# Altium PCB 9269_PCB1.PcbDoc (part 1 of 2)
Units mil, origin at the board's own origin, x right, y up, seen from the top; angles counter-clockwise.
Board outline 2770 x 5319.52 mil, 2 copper layers (Top Layer, Bottom Layer), stack 62.2 mil thick; 87 components, 63 nets, 294 pads, 108 vias.
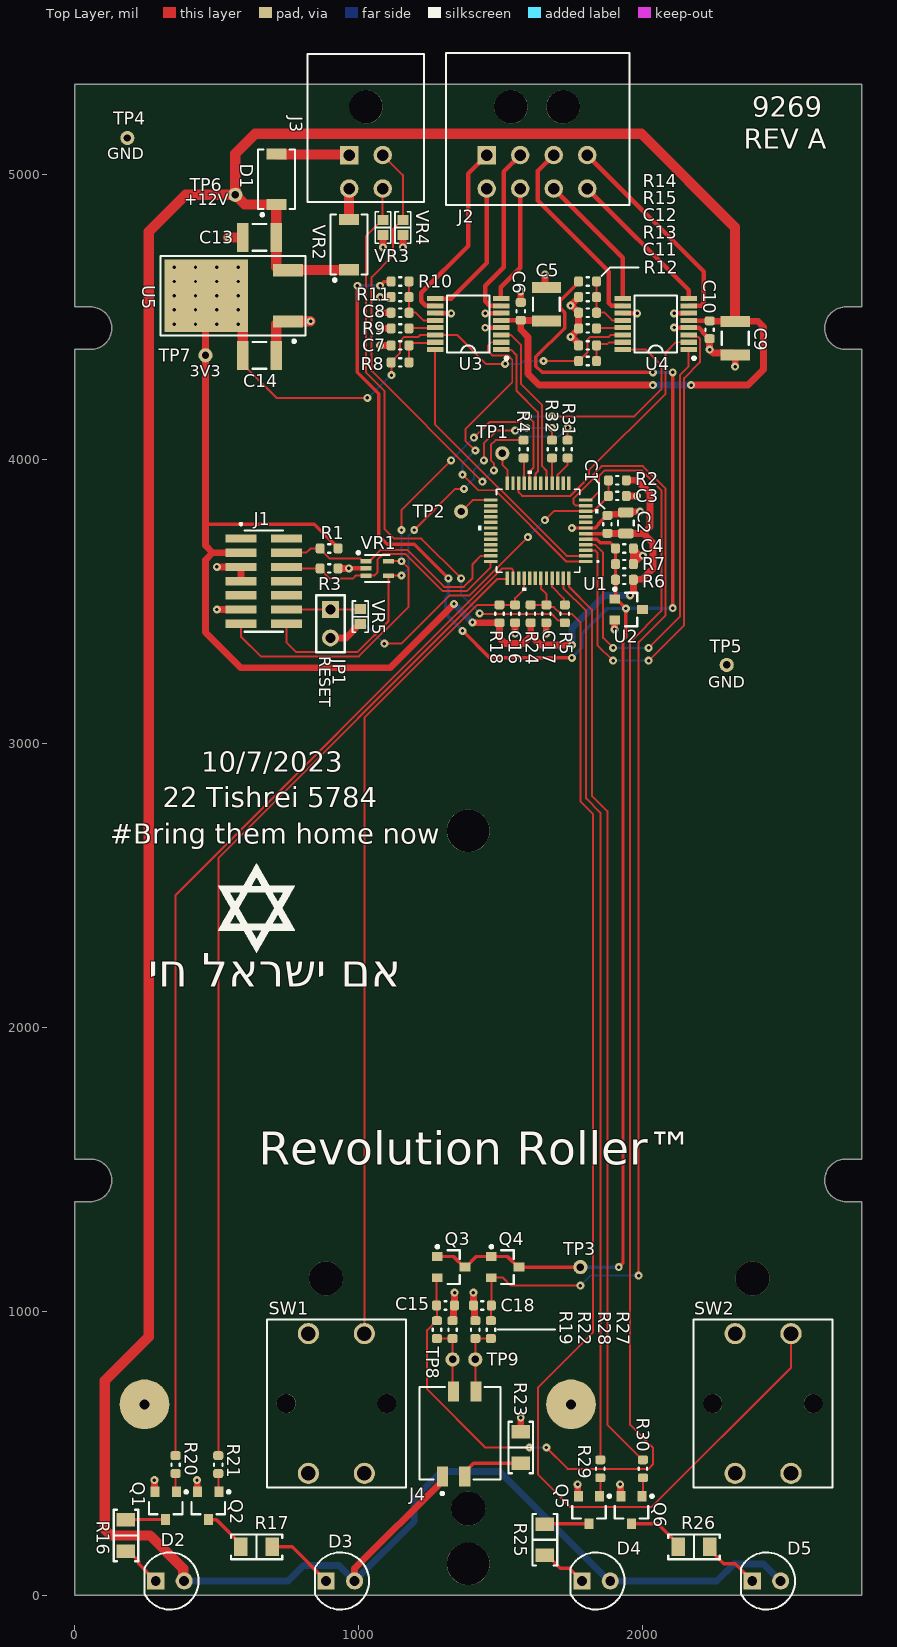
[diagram p0: Top Layer view]
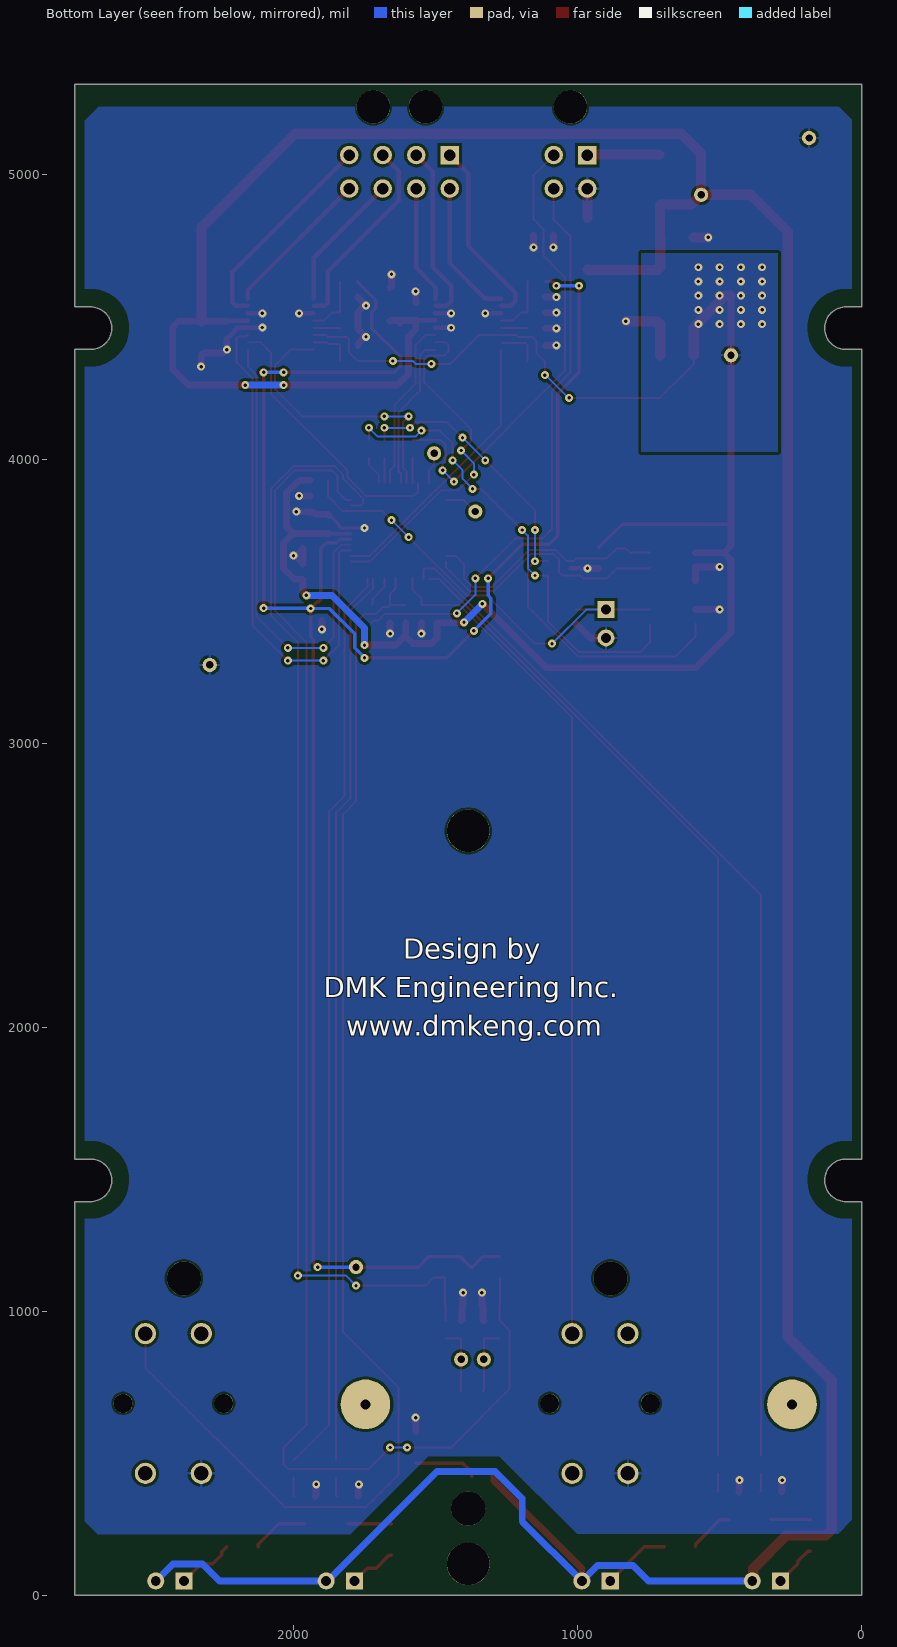
[diagram p1: Bottom Layer view, seen from below]
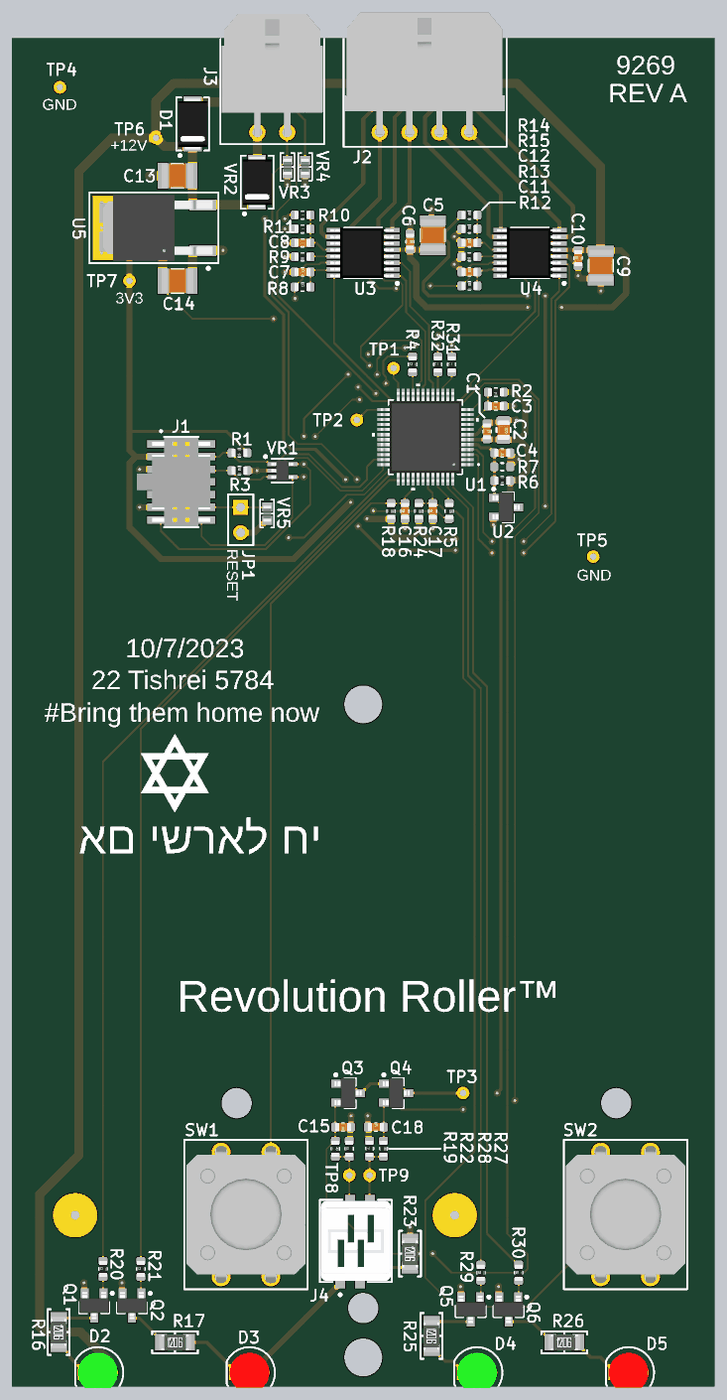
[diagram p2: 3D render of the assembled board from above, using the file's embedded part models]

## Layer stack, top to bottom
Top Solder: solder mask 0.4, Solder Resist, Dk 3.5
Top Layer: signal copper 1.4
Dielectric 1: dielectric 59.4, FR-4, Dk 4.8
Bottom Layer: signal copper 1.4
Bottom Solder: solder mask 0.4, Solder Resist, Dk 3.5

## Board outline
0,0 0,1385.54 55,1385.54 ccw(c55,1460.54) 55,1535.54 0,1535.54 0,4385.54 55,4385.54 ccw(c55,4460.54) 55,4535.54 0,4535.54 0,5319.52 2770,5319.52 2770,4535.54 2715,4535.54 ccw(c2715,4460.54) 2715,4385.54 2770,4385.54 2770,1535.54 2715,1535.54 ccw(c2715,1460.54) 2715,1385.54 2770,1385.54 2770,0

## Design rules (kind name [scope] priority, off if disabled: settings)
Clearance [All] p1: gap=7 ignorepadtopadclearanceinfootprint=FALSE except(10: Arc-Fill Arc-Poly Arc-Region Track-Fill Track-Poly Track-Region SMDPad-Fill SMDPad-Poly SMDPad-Region THPad-Fill THPad-Poly THPad-Region Via-Fill Via-Poly Via-Region Fill-Fill Fill-Poly Fill-Region Poly-Poly Poly-Region Region-Region)
HoleSize [All] p1: absolutevalues=TRUE maxlimit=150 minlimit=1 maxpercent=80.000 minpercent=20.000
MinimumSolderMaskSliver [All] p1: minsoldermaskwidth=0
PolygonConnect [All] p1: thpad.connectstyle=Relief thpad.reliefconductorwidth=10 thpad.reliefentries=4 thpad.polygonreliefangle="90 Angle" thpad.airgapwidth=10 smdpad.connectstyle=Relief smdpad.reliefconductorwidth=10 smdpad.reliefentries=4 smdpad.polygonreliefangle="90 Angle" smdpad.airgapwidth=10 via.connectstyle=Direct via.reliefconductorwidth=10 via.reliefentries=4 via.polygonreliefangle="90 Angle" via.airgapwidth=10
RoutingVias [All] p1: holewidth=12 width=28 viastyle="Through Hole" minholewidth=12 minwidth=24 maxholewidth=24 maxwidth=48
SilkToSilkClearance [All] p1: silktosilkclearance=6
SilkToSolderMaskClearance [IsPad] p1: minsilkscreentomaskgap=2 clearancetoexposedcopper=TRUE
SolderMaskExpansion [All] p1: expansion=4 istentingtop=FALSE
Width [All] p1: maxlimit=48 minlimit=7 preferedwidth=7
26 further rules are at their usual default settings.

## Classes and differential pairs
component class Sheet3: C13 C14 C15 C16 C17 C18 D1 D2 D3 D4 D5 J3 J4 Q1 Q2 Q3 Q4 Q5 Q6 R16 R17 R18 R19 R20 R21 R22 R23 R24 R25 R26 R27 R28 R29 R30 SW1 SW2 TP6 TP7 TP8 TP9 U5 VR3 VR4
component class Sheet2: C5 C6 C7 C8 C9 C10 C11 C12 J2 R8 R9 R10 R11 R12 R13 R14 R15 U3 U4 VR2
component class Sheet1: C1 C2 C3 C4 J1 JP1 R1 R2 R3 R4 R5 R6 R7 R31 R32 TP1 TP2 TP3 TP4 TP5 U1 U2 VR1 VR5

## Components (designator, comment, footprint, x,y, rotation, side; value= is the part's Value field where it differs from the comment)
C1 "100nF" C_0603 1875,3770 r270 top
C2 "10uF" C_0805 1940,3775 r90 top
C3 "100nF" C_0603 1910,3870 r180 top
C4 "100nF" C_0603 1935,3685 r180 top
C5 "47uF" C_1210 1660,4545 r270 top
C6 "100nF" C_0603 1570,4520 r270 top
C7 "22nF" C_0603 1145,4400 r0 top
C8 "100nF" C_0603 1145,4515 r0 top
C9 "47uF" C_1210 2325,4425 r90 top
C10 "100nF" C_0603 2235,4455 r90 top
C11 "22nF" C_0603 1805,4400 r0 top
C12 "100nF" C_0603 1805,4515 r0 top
C13 "47uF" C_1210 650,4780 r0 top
C14 "47uF" C_1210 650,4365 r180 top
C15 "100nF" C_0603 1305,1020 r180 top
C16 "100nF" C_0603 1550,3455 r90 top
C17 "100nF" C_0603 1660,3455 r90 top
C18 "100nF" C_0603 1435,1020 r0 top
D1 "DIODE SCHOTTKY" "DO-214AC (SMA)" 710,4985 r90 top
D2 "LED_GRN" LED_T1_GRN 335,50 r0 top locked
D3 "LED_RED" LED_T1_RED 935,50 r0 top locked
D4 "LED_GRN" LED_T1_GRN 1835,50 r0 top
D5 "LED_RED" LED_T1_RED 2435,50 r0 top
J1 "Header 7X2" SAMTEC_FTSH-107-01-L-DV-K-P-TR 665,3570 r270 top
J2 "Header 4X2A" "MOLEX 43045-0800" 1627,5070 r180 top
J3 "Header 2X2A" "MOLEX 43045-0400" 1025,5070 r180 top
J4 "Header 2x2" "Kyocera 009159004651906" 1353,568 r0 top
JP1 "Jumper" HDR1X2 900,3470 r270 top
Q1 "NMOS-2" SOT23-3 320,315 r270 top
Q2 "NMOS-2" SOT23-3 470,315 r270 top
Q3 "MMBT3906" SOT23-3 1325,1155 r0 top
Q4 "MMBT3906" SOT23-3 1515,1155 r0 top
Q5 "NMOS-2" SOT23-3 1810,300 r270 top
Q6 "NMOS-2" SOT23-3 1960,300 r270 top
R1 "1M0" R_0603 895,3685 r0 top value=1MR
R2 "1M0" R_0603 1910,3925 r0 top value=1MR
R3 "10K" R_0603 895,3615 r180 top value=10kR
R4 "43R0" R_0603 1580,4035 r270 top value=43R
R5 "43R0" R_0603 1725,3455 r90 top value=43R
R6 "1K0" R_0603 1935,3575 r0 top value=1kR
R7 "DNI" "R_0603 - DNI" 1935,3630 r0 top
R8 "10K" R_0603 1145,4340 r180 top value=10kR
R9 "49K9" R_0603 1145,4460 r0 top value=49.9kR
R10 "5K11" R_0603 1145,4625 r180 top value=5.11kR
R11 "10K" R_0603 1145,4570 r180 top value=10kR
R12 "10K" R_0603 1805,4345 r180 top value=10kR
R13 "49K9" R_0603 1805,4460 r0 top value=49.9kR
R14 "5K11" R_0603 1805,4625 r180 top value=5.11kR
R15 "10K" R_0603 1805,4570 r180 top value=10kR
R16 "562R" R_1206 180,210 r270 top
R17 "562R" R_1206 640,170 r0 top
R18 "3K3" R_0603 1495,3455 r90 top
R19 "10K" R_0603 1275,935 r90 top value=10kR
R20 "43R0" R_0603 355,460 r270 top value=43R
R21 "43R0" R_0603 505,460 r270 top value=43R
R22 "10K" R_0603 1330,935 r270 top value=10kR
R23 "909R" R_1206 1570,520 r270 top
R24 "3K3" R_0603 1605,3455 r90 top
R25 "562R" R_1206 1655,195 r270 top
R26 "562R" R_1206 2180,170 r0 top
R27 "10K" R_0603 1465,935 r90 top value=10kR
R28 "10K" R_0603 1410,935 r270 top value=10kR
R29 "43R0" R_0603 1850,445 r270 top value=43R
R30 "43R0" R_0603 2000,445 r270 top value=43R
R31 "43R0" R_0603 1735,4035 r270 top value=43R
R32 "43R0" R_0603 1680,4035 r270 top value=43R
SW1 "PTS125SL43P25M" "SWITCH PUSHBUTTON C&K PTS125" 921,675 r270 top locked
SW2 "PTS125SL43P25M" "SWITCH PUSHBUTTON C&K PTS125" 2423,675 r270 top locked
TP1 "TEST POINT" TP 1505,4020 r90 top
TP2 "TEST POINT" TP 1360,3815 r90 top
TP3 "TEST POINT" TP 1780,1155 r90 top
TP4 "TEST POINT" TP 185,5130 r90 top
TP5 "TEST POINT" TP 2295,3275 r90 top
TP6 "TEST POINT" TP 565,4930 r90 top
TP7 "TEST POINT" TP 460,4365 r90 top
TP8 "TEST POINT" TP 1330,830 r90 top
TP9 "TEST POINT" TP 1410,830 r90 top
U1 "STM32C031C6T6" LQFP48-7x7mm_STM 1631.1,3747.32 r180 top
U2 "LM4040" SOT23-3 1950,3470 r0 top
U3 "TC78H660FNG" TSSOP-16 1385,4475 r180 top
U4 "TC78H660FNG" TSSOP-16 2045,4475 r180 top
U5 "Voltage Regulator DPAK" "DPAK (TO-252) Large" 501.97,4574.45 r90 top
VR1 "ESD Quad Diode" "SOT-353-5 (SC70)" 1065,3615 r0 top value=7.5pF
VR2 "SMAJ12A" "DO-214AC (SMA)" 965,4755 r90 top
VR3 "TVS Diode Bidirectional" BEAD_0603 1085,4815 r270 top value=0.5pF
VR4 "TVS Diode Bidirectional" BEAD_0603 1155,4815 r270 top value=0.5pF
VR5 "TVS Diode Bidirectional" BEAD_0603 1005,3445 r270 top value=0.5pF

## Footprints (in the part's own frame and the unit in brackets; to place one, negate y for a bottom-side part, rotate by r counter-clockwise, add the part's x,y. Pads: shape width x height; smd on the part's side, far side on the other; paste and mask are expansions set on the pad)
BEAD_0603 [mm] "Chip Ferrite, 2-Leads, Body 1.60x0.80mm, IPC Medium Density"
  rect 0.9x1 smd: 1(-0.675,0) 2(0.675,0)
  silkscreen extent -1.4,-0.7 1.4,0.7, body extent -0.8,-0.41 0.8,0.41, height 0.82
C_0603 [mm] "Chip Capacitor, 2-Leads, Body 1.6x0.8mm, IPC Medium Density"
  rrect50% 0.8x0.9 smd: 1(-0.8,0) 2(0.8,0)
  silkscreen extent -0.1,-0.38 0.1,0.38, body extent -0.8,-0.4 0.8,0.4, height 0.3
C_0805 [mm] "0805 (2012 Metric) 0.079\" L x 0.049\" W (2.00mm x 1.25mm)"
  rrect50% 0.9x1.4 smd: 1(0.95,0) 2(-0.95,0)
  silkscreen extent -0.2,-0.7 0.2,0.7, body extent -1,-0.63 1,0.62, height 0.78
C_1210 [mm] "Chip Capacitor, 2-Leads, Body 3.2x2.5mm, IPC Medium Density"
  rect 1x2.6 smd: 1(-1.5,0) 2(1.5,0)
  silkscreen extent -0.6,-1.2 0.6,1.2, body extent -1.6,-1.25 1.6,1.25, height 0.95
"DO-214AC (SMA)" [mm]
  rect 1x1.8 smd: 1(-2.25,0) 2(2.25,0)
  silkscreen extent -3.3,-1.65 2.67,1.65, body extent -2.64,-1.46 2.64,1.46, height 2.41
"DPAK (TO-252) Large" [mm]
  rect 1.1x2.7 smd: 1(-2.3,-6.3) 2(2.3,-6.3)
  rect 2x2.5 on Top Paste: 3(-1.4,2.8) 3(-1.4,-0.5) 3(1.5,2.8) 3(1.5,-0.5)
  rect 6.5x7.5 smd paste-3.25: 3(0,1)
  silkscreen extent -4.19,-7.87 3.56,5.08, body extent -3.3,-7.29 3.3,3.71, height 2.31
HDR1X2 [mm] "Connector; Header; 2 Position"
  rect 1.5x1.5 hole 0.9: 1(0,0)
  round 1.5 hole 0.9: 2(2.54,0)
  silkscreen extent -1.27,-1.27 3.81,1.27
"Kyocera 009159004651906" [mm]
  rect 1x1.8 smd: 1(-1.5,-3.8) 2(0.5,-3.8) 3(1.5,3.8) 4(-0.5,3.8)
  silkscreen extent -3.56,-5.45 3.68,4.19, body extent -3.43,-3.94 3.57,4.06, height 5.01
LED_T1_GRN [mil]
  rect 60x60 hole 35: 1(-50,0)
  round 60 hole 35: 2(50,0)
  silkscreen extent -90,-101 101,101, body extent -78,-59 78,78, height 262
LED_T1_RED [mil]
  rect 60x60 hole 35: 1(-50,0)
  round 60 hole 35: 2(50,0)
  silkscreen extent -90,-101 101,101, body extent -78,-59 78,78, height 262
LQFP48-7x7mm_STM [mil]
  rect 47x12 smd paste+0 mask+0: 1(-167.32,108.27) 2(-167.32,88.58) 3(-167.32,68.9) 4(-167.32,49.21) 5(-167.32,29.53) 6(-167.32,9.84) 7(-167.32,-9.84) 8(-167.32,-29.53) 9(-167.32,-49.21) 10(-167.32,-68.9) 11(-167.32,-88.58) 12(-167.32,-108.27) 25(167.32,-108.27) 26(167.32,-88.58) 27(167.32,-68.9) 28(167.32,-49.21) 29(167.32,-29.53) 30(167.32,-9.84) 31(167.32,9.84) 32(167.32,29.53) 33(167.32,49.21) 34(167.32,68.9) 35(167.32,88.58) 36(167.32,108.27)
  rect 12x47 smd paste+0 mask+0: 13(-108.27,-167.32) 14(-88.58,-167.32) 15(-68.9,-167.32) 16(-49.21,-167.32) 17(-29.53,-167.32) 18(-9.84,-167.32) 19(9.84,-167.32) 20(29.53,-167.32) 21(49.21,-167.32) 22(68.9,-167.32) 23(88.58,-167.32) 24(108.27,-167.32) 37(108.27,167.32) 38(88.58,167.32) 39(68.9,167.32) 40(49.21,167.32) 41(29.53,167.32) 42(9.84,167.32) 43(-9.84,167.32) 44(-29.53,167.32) 45(-49.21,167.32) 46(-68.9,167.32) 47(-88.58,167.32) 48(-108.27,167.32)
  silkscreen extent -214,-211 211,211, body extent -177,-177 177,177, height 63
"MOLEX 43045-0400" [mil]
  rect 65x65 hole 40: 1(59,0)
  round 65 hole 40: 2(-59,0) 3(59,118) 4(-59,118)
  round 118 hole 118 unplated: 9(0,-170)
  silkscreen extent -205,-355 205,165, body extent -200,-350 200,132, height 346
"MOLEX 43045-0800" [mil]
  rect 65x65 hole 40: 1(177,0)
  round 65 hole 40: 2(59,0) 3(-59,0) 4(-177,0) 5(177,118) 6(59,118) 7(-59,118) 8(-177,118)
  round 118 hole 118 unplated: 9(-92,-170) 9(92,-170)
  silkscreen extent -325,-360 320,175, body extent -318,-355 318,127, height 346
R_0603 [mm] "Chip Resistor; Body 1.55 x 0.85 mm (LxW typ)"
  rrect50% 0.8x0.9 smd: 1(0.8,0) 2(-0.8,0)
  silkscreen extent -0.1,-0.38 0.1,0.38, body extent -0.8,-0.4 0.8,0.4, height 0.3
"R_0603 - DNI" [mm] "Chip Resistor; Body 1.55 x 0.85 mm (LxW typ)"
  rrect50% 0.8x0.9 smd: 1(0.8,0) 2(-0.8,0)
  silkscreen extent -0.1,-0.38 0.1,0.38
R_1206 [mm] "Chip Resistor, 2-Leads, Body 3.13x1.55mm, IPC Medium Density"
  rect 1.2x1.65 smd: 1(-1.4,0) 2(1.4,0)
  silkscreen extent -2.3,-1.1 2.3,1.1, body extent -1.57,-0.8 1.63,0.8, height 0.6
SAMTEC_FTSH-107-01-L-DV-K-P-TR [mm]
  rect 0.74x2.79 smd: 1(-3.81,-2.035) 2(-3.81,2.035) 3(-2.54,-2.035) 4(-2.54,2.035) 5(-1.27,-2.035) 6(-1.27,2.035) 7(0,-2.035) 8(0,2.035) 9(1.27,-2.035) 10(1.27,2.035) 11(2.54,-2.035) 12(2.54,2.035) 13(3.81,-2.035) 14(3.81,2.035)
  silkscreen extent -5.19,-2.13 4.53,1.72, body extent -4.45,-4.44 4.44,2.92, height 7
SOT23-3 [mm] "SOT23, 3-Leads, Body 2.92x2.51mm, Pitch 0.95mm, IPC Medium Density"
  rect 0.95x0.8 smd: 1(-1.235,0.95) 2(-1.235,-0.95) 3(1.235,0)
  silkscreen extent -1.36,-1.5 0.76,1.95, body extent -1.36,-1.52 1.36,1.52, height 1.12
"SOT-353-5 (SC70)" [mm] "SOT23, 6-Leads, Body 2.92x2.51mm, Pitch 0.95mm, IPC Medium Density"
  rect 1x0.4 smd: 1(-1,0.65) 2(-1,0) 3(-1,-0.65) 4(1,-0.65) 5(1,0.65)
  silkscreen extent -1.82,-1.2 1.1,1.52, body extent -1.1,-1 1.1,1, height 0.97
"SWITCH PUSHBUTTON C&K PTS125" [mm]
  round 1.9 hole 1.3: 1(-6.25,2.5) 2(6.25,2.5) 3(6.25,-2.5) 4(-6.25,-2.5)
  round 1.7 hole 1.7 unplated: 5(0,4.5) 6(0,-4.5)
  silkscreen extent -7.5,-6.2 7.5,6.2, body extent -6.85,-6 6.85,6, height 4.31
TP [mil] "Test Point"
  round 50 hole 26: 1(0,0)
TSSOP-16 [mm]
  rect 1.45x0.45 smd: 1(-2.95,2.275) 2(-2.95,1.625) 3(-2.95,0.975) 4(-2.95,0.325) 5(-2.95,-0.325) 6(-2.95,-0.975) 7(-2.95,-1.625) 8(-2.95,-2.275) 9(2.95,-2.275) 10(2.95,-1.625) 11(2.95,-0.975) 12(2.95,-0.325) 13(2.95,0.325) 14(2.95,0.975) 15(2.95,1.625) 16(2.95,2.275)
  silkscreen extent -3.56,-2.54 1.91,3.17, body extent -3.08,-2.5 3.32,2.5, height 1.22

## Part data
C1 C3 C4 C6 C8 C10 C12 C15 C16 C17 C18: library part CAP, "CAP CER 0.1UF 50V X7R 0603", Case Code (Imperial)=0603, Case Code (Metric)=1608, Manufacturer=Samsung, Manufacturer Part Number=CL10B104KB8NNWC, Max Operating Temperature=125°C, Min Operating Temperature=-55°C, Package Quantity=1, Supplier Part Number 1=187-CL10B104KB8NNWC, Tolerance=10%, Voltage Rating=50V, Capacitance=100nF, Case/Package=0603, Category="Ceramic Capacitors", ComponentLink1Description=https://datasheet.ciiva.com/25740/cl10b104kb8nnwc-25740227.pdf?src-supplier=Digikey, ComponentLink1URL=https://datasheet.ciiva.com/25740/cl10b104kb8nnwc-25740227.pdf?src-supplier=Digikey, Length=0.063inch, Mounting Technology="Surface Mount", Packaging="Cut Tape", Pricing 1="1=0.1, 10=0.009, 50=0.009, 100=0.006, 1000=0.005, 10000=0.003 (USD)", RoHS=Yes, RoHS Compliant=Yes, Series=CL, Stock 1=581862, Supplier 1=Mouser, Thickness=0.035inch, Width=0.031inch
C2: library part CAP, "Multilayer Ceramic Capacitor, 10 uF, 25 V, ± 10%, X5R, 0805 [2012 Metric]", Case Code (Imperial)=0805, Case Code (Metric)=2012, Dielectric=X5R, Manufacturer=Samsung, Manufacturer Part Number=CL21A106KAYNNNE, Max Operating Temperature=85°C, Min Operating Temperature=-55°C, Package Quantity=1, Supplier Part Number 1=187-CL21A106KAYNNNE, Tolerance=10%, Voltage Rating=25V, Case/Package=0805, Category="Ceramic Capacitors", ComponentLink1Description=https://datasheet.ciiva.com/25796/cl21a106kaynnne-25796720.pdf?src-supplier=Digikey, ComponentLink1URL=https://datasheet.ciiva.com/25796/cl21a106kaynnne-25796720.pdf?src-supplier=Digikey, ComponentLink2Description=https://datasheet.ciiva.com/26838/getdatasheetpartid-357558-26838583.pdf?src-supplier=Verical, ComponentLink2URL=https://datasheet.ciiva.com/26838/getdatasheetpartid-357558-26838583.pdf?src-supplier=Verical, Construction=Flat, Depth=1.25mm, Height=1.25mm, Length=2mm, Material=Ceramic, Mounting Technology="Surface Mount", Packaging="Tape and Reel", Pricing 1="1=0.18, 10=0.073, 50=0.073, 100=0.043, 1000=0.035, 2000=0.029, 10000=0.026, 24000=0.024, 50000=0.022, 100000=0.018 (USD)", Radiation Hardening=No, RoHS=Yes, RoHS Compliant=Yes, Series=CL, Stock 1=463149, Supplier 1=Mouser, Thickness=0.057inch, Voltage Rating (DC)=25V, Width=0.049inch
C5 C9 C13 C14: library part CAP, "Multilayer Ceramic Capacitor, 47 uF, 16 V, ± 10%, X5R, 1210 [3225 Metric]", Case Code (Imperial)=1210, Case Code (Metric)=3225, Dielectric=X5R, Manufacturer=Samsung, Manufacturer Part Number=CL32A476KOJNNNE, Max Operating Temperature=85°C, Min Operating Temperature=-55°C, Package Quantity=1, Supplier Part Number 1=187-CL32A476KOJNNNE, Tolerance=10%, Voltage Rating=16V, Capacitance=47uF, Case/Package=1210, Category="Ceramic Capacitors", ComponentLink1Description=https://datasheet.ciiva.com/25785/cl32a476kojnnne-25785873.pdf?src-supplier=Digikey, ComponentLink1URL=https://datasheet.ciiva.com/25785/cl32a476kojnnne-25785873.pdf?src-supplier=Digikey, Height=2.8mm, Lead Free="Lead Free", Length=0.126inch, Material=4241ConductorMaterial, Mounting Technology="Surface Mount", Packaging="Cut Tape", Pricing 1="1=0.65, 10=0.386, 50=0.386, 100=0.249, 1000=0.204, 2000=0.185, 10000=0.168, 25000=0.164, 50000=0.161 (USD)", RoHS=Yes, RoHS Compliant=Yes, Series=CL, Stock 1=246355, Supplier 1=Mouser, Thickness=0.106inch, Voltage Rating (DC)=16V, Width=0.098inch
C7 C11: library part CAP, "Multilayer Ceramic Capacitor, 0.022 uF, 50 V, ± 10%, X7R, 0603 [1608 Metric]", Case Code (Imperial)=0603, Case Code (Metric)=1608, Dielectric=X7R, Manufacturer=Samsung, Manufacturer Part Number=CL10B223KB8NNNC, Max Operating Temperature=125°C, Min Operating Temperature=-55°C, Package Quantity=1, Supplier Part Number 1=187-CL10B223KB8NNNC, Tolerance=10%, Voltage=50V, Capacitance=22nF, Case/Package=0603, Category="Ceramic Capacitors", ComponentLink1Description=https://datasheet.ciiva.com/25802/cl10b223kb8nnnc-25802289.pdf?src-supplier=Digikey, ComponentLink1URL=https://datasheet.ciiva.com/25802/cl10b223kb8nnnc-25802289.pdf?src-supplier=Digikey, ComponentLink2Description=https://datasheet.ciiva.com/26838/getdatasheetpartid-357419-26838449.pdf?src-supplier=Verical, ComponentLink2URL=https://datasheet.ciiva.com/26838/getdatasheetpartid-357419-26838449.pdf?src-supplier=Verical, ComponentLink3Description=https://datasheet.ciiva.com/29198/457190-da-01-en-vs-kondensator-0603-29198760.pdf?src-supplier=Conrad, ComponentLink3URL=https://datasheet.ciiva.com/29198/457190-da-01-en-vs-kondensator-0603-29198760.pdf?src-supplier=Conrad, ComponentLink4Description=https://datasheet.ciiva.com/26310/mlcc-catalogdownload2013-eng-26310316.pdf?src-supplier=Distrelec, ComponentLink4URL=https://datasheet.ciiva.com/26310/mlcc-catalogdownload2013-eng-26310316.pdf?src-supplier=Distrelec, ComponentLink5Description=https://datasheet.ciiva.com/16318/cl05b104kq5nnnc-16318246.pdf?src-supplier=Future+Electronics, ComponentLink5URL=https://datasheet.ciiva.com/16318/cl05b104kq5nnnc-16318246.pdf?src-supplier=Future+Electronics, Construction=Flat, Depth=0.8mm, Height=0.8mm, Lead Free="Lead Free", Length=1.6mm, Material=Ceramic, Mounting Technology="Surface Mount", Packaging="Tape and Reel", Pricing 1="1=0.1, 10=0.015, 50=0.015, 100=0.011, 1000=0.009, 10000=0.006 (USD)", Radiation Hardening=No, RoHS=Yes, RoHS Compliant=Yes, Series=CL, Stock 1=72426, Supplier 1=Mouser, Thickness=0.035inch, Voltage Rating=50V, Voltage Rating (DC)=50V, Width=0.031inch
D1: library part DIODE_SMA_SCHOTTKY, "Rectifier Diode, Schottky, 1 Phase, 1 Element, 2A, 100V V(RRM), Silicon, DO-214AC", Average Rectified Current=2A, Case/Package=SMA, Forward Voltage=880mV, Manufacturer=STMicroelectronics, Manufacturer Part Number=STPS2H100A, Max Forward Surge Current (Ifsm)=75A, Max Operating Temperature=175°C, Max Repetitive Reverse Voltage (Vrrm)=100V, Max Reverse Current=1uA, Min Operating Temperature=-65°C, Package Quantity=1, Supplier Part Number 1=511-STPS2H100A, Category="Rectifier Diodes", ComponentLink1Description=https://datasheet.ciiva.com/14178/cd00001548-14178421.pdf?src-supplier=Distrelec, ComponentLink1URL=https://datasheet.ciiva.com/14178/cd00001548-14178421.pdf?src-supplier=Distrelec, ComponentLink2Description=https://datasheet.ciiva.com/16394/cd00001548-16394856.pdf?src-supplier=Future+Electronics, ComponentLink2URL=https://datasheet.ciiva.com/16394/cd00001548-16394856.pdf?src-supplier=Future+Electronics, ComponentLink3Description=https://datasheet.ciiva.com/7963/1724011-7963926.pdf?src-supplier=Element14, ComponentLink3URL=https://datasheet.ciiva.com/7963/1724011-7963926.pdf?src-supplier=Element14, ComponentLink4Description=https://datasheet.ciiva.com/7963/1724011-7963927.pdf?src-supplier=Element14, ComponentLink4URL=https://datasheet.ciiva.com/7963/1724011-7963927.pdf?src-supplier=Element14, ComponentLink5Description=https://datasheet.ciiva.com/916/cd00001548-916178.pdf?src-supplier=Digikey, ComponentLink5URL=https://datasheet.ciiva.com/916/cd00001548-916178.pdf?src-supplier=Digikey, ComponentLink6Description=https://datasheet.ciiva.com/916/cd00001548-916177.pdf?src-supplier=Digikey, ComponentLink6URL=https://datasheet.ciiva.com/916/cd00001548-916177.pdf?src-supplier=Digikey, ComponentLink7Description=https://datasheet.ciiva.com/916/cd00001548-916179.pdf?src-supplier=Digikey, ComponentLink7URL=https://datasheet.ciiva.com/916/cd00001548-916179.pdf?src-supplier=Digikey, Current Rating=2A, Forward Current=2A, Height=2.03mm, Lead Free="Lead Free", Length=4.6mm, Max Reverse Leakage Current=1uA, Max Reverse Voltage (DC)=100V, Max Surge Current=75A, Mounting Technology="Surface Mount", Output Current=2A, Packaging="Tape and Reel", Peak Non-Repetitive Surge Current=75A, Pins=2, Polarity=Standard, Pricing 1="1=0.38, 10=0.294, 50=0.294, 100=0.177, 1000=0.115, 10000=0.088 (USD)", Radiation Hardening=No, Reach SVHC Compliant=No, RoHS=Yes, RoHS Compliant=Yes, Series=-, Stock 1=49306, Supplier 1=Mouser, Voltage Rating (DC)=100V, Width=2.95mm
D2 D4: "LED Uni-Color Green 515nm 2-Pin T-1 Bulk", Case/Package=Radial, Color=Green, Forward Current=20mA, Forward Voltage=3.3V, Lens Color=Colorless, Manufacturer=Kingbright, Manufacturer Part Number=WP710A10ZGCK, Max Operating Temperature=85°C, Min Operating Temperature=-40°C, Package Quantity=500, Supplier Part Number 1=604-WP710A10ZGCK, Category=LEDs, ComponentLink1Description=https://datasheet.ciiva.com/16421/wp710a10zgck-262246-16421032.pdf?src-supplier=Mouser, ComponentLink1URL=https://datasheet.ciiva.com/16421/wp710a10zgck-262246-16421032.pdf?src-supplier=Mouser, ComponentLink2Description=https://datasheet.ciiva.com/29562/wp710a10zgck-29562178.pdf?src-supplier=Digikey, ComponentLink2URL=https://datasheet.ciiva.com/29562/wp710a10zgck-29562178.pdf?src-supplier=Digikey, Dominant Wavelength=525nm, Height=5.9mm, Illumination Color=Green, Lead Free="Lead Free", Lens Size=3mm, Lens Style=Dome,Round,Domed, Lens Transparency=Clear, Luminous Intensity=8000mcd, Mounting Technology="Through Hole", Packaging=Bulk, Pricing 1="1=0.51, 10=0.338, 50=0.338, 100=0.226, 1000=0.155, 10000=0.149 (USD)", RoHS=Yes, Series=-, Stock 1=2647, Supplier 1=Mouser, Test Current=20mA, Viewing Angle=34°
D3 D5: "LED Uni-Color Red 630nm 2-Pin T-1 Bulk", Manufacturer=Kingbright, Manufacturer Part Number=WP710A10SURTK, Supplier Part Number 1=604-WP710A10SURTK, Pricing 1="1=0.37, 10=0.299, 50=0.299, 100=0.134, 1000=0.099, 10000=0.069 (USD)", RoHS=No, Stock 1=50, Supplier 1=Mouser
J1: "Conn Unshrouded Header HDR 14 POS 1.27mm Solder ST Top Entry SMD T/R", Manufacturer=Samtec, Manufacturer Part Number=FTSH-107-01-L-DV-K-P-TR, Supplier Part Number 1=200-FTSH10701LDVKPTR, Category="Headers and Wire Housings", ComponentLink1Description=https://datasheet.ciiva.com/10025/ftsh-mt-10025356.pdf?src-supplier=Avnet, ComponentLink1URL=https://datasheet.ciiva.com/10025/ftsh-mt-10025356.pdf?src-supplier=Avnet, Contact Plating=Gold, Gender=Male, Lead Free="Lead Free", Number of Contacts=14, Number of Rows=2, Pitch=1.27mm, Pricing 1="1=4.94, 10=4.46, 50=4.46, 100=3.95, 250=3.5, 400=3.44, 1000=3.44, 2400=3.32, 4800=2.5, 10000=3.32 (USD)", RoHS=Yes, RoHS Compliant=Yes, Stock 1=3070, Supplier 1=Mouser, Termination=Solder
J2: "Connector Wire to Board Header 8 Position 3mm Solder Right Angle Thru-Hole Tray", Contact Resistance=10mR, Flammability Rating="UL94 V-0", Housing Color=Black, Manufacturer=Molex, Manufacturer Part Number=0430450800, Max Operating Temperature=105°C, Max Voltage Rating (AC)=250V, Min Operating Temperature=-40°C, Supplier Part Number 1=538-43045-0800, Contact Material=Brass, Contact Plating=Tin, Depth=12.2mm, Housing Material=Polymer, LatestRevisionDate=17-Jul-2002, LatestRevisionNote="Re-released for DXP Platform.", Length=16.15mm, Number of Rows=2, Orientation="Right Angle", Packaging=Tray, Pitch=3mm, Pricing 1="1=2.63, 10=2.01, 50=2.01, 100=1.83, 1000=1.83, 10000=1.83, 10080=1.04 (USD)", Publisher="Altium Limited", RoHS=Yes, RoHS Compliant=Yes, Stock 1=6399, Supplier 1=Mouser, Termination=Solder
J3: "MOLEX 43045-0400 Header, Dual Row, 90°, 4p, Tin Plating Snap-in Peg PCB Lock, GW Compatible", Case/Package=101Case, Color=Black, Contact Resistance=10mR, Current Rating=5A, Flammability Rating=5813Flammability, Manufacturer=Molex, Manufacturer Part Number=43045-0400, Max Operating Temperature=105°C, Max Voltage Rating (AC)=250V, Max Voltage Rating (DC)=250.25kV, Min Operating Temperature=-40°C, Supplier Part Number 1=538-43045-0400, Voltage Rating=600V, Approvals=UL,CSA,TUV, Category="Headers and Wire Housings", Contact Gender=Male, Contact Material=Brass,Tin, Contact Plating=Tin, Contact Type="Male Pin", Depth=12.2mm, Diameter=3mm, Fastening Type=Ramp, Gender=Male, Glow Wire Compliant=15Compliance, Halogen Free=5696HalogenFree, Housing Color=Black, Housing Material=Thermoplastic, LatestRevisionDate=17-Jul-2002, LatestRevisionNote="Re-released for DXP Platform.", Lead Free=5697LeadFree, Lead Pitch=3mm, Length=10.15mm, Material=Polyester, Mounting Technology="Through Hole", Number of Circuits=4, Number of Contacts=4, Number of Poles=4, Number of Positions=4, Number of Rows=2, Orientation="Right Angle", Packaging=Tray, Pitch=3mm, Plating=154ConductorMaterial, Pricing 1="1=1.53, 10=0.877, 50=0.877, 100=0.782, 558=0.739, 1000=0.739, 1116=0.693, 10000=0.693, 10044=0.593 (USD)", Publisher="Altium Limited", Radiation Hardening=No, Reach SVHC Compliant=Unknown, RoHS=Yes, RoHS Compliant=Yes, Row Spacing=0.118inch, Series="Micro-Fit 3.0™ 43045", Stock 1=18230, Supplier 1=Mouser, Termination=Solder, Voltage Rating (AC)=250V, Voltage Rating (DC)=250V, Width=9.9mm, Working Voltage=250V
J4: "2x2 Position Female White Vertical Dual Row Top Entry Card Edge Connector", Manufacturer="Kyocera AVX", Manufacturer Part Number=009159004651906, Supplier Part Number 1=581-009159004651906, Pricing 1="1=0.99, 10=0.841, 50=0.841, 100=0.755, 1000=0.618, 10000=0.486 (USD)", RoHS=No, Stock 1=3916, Supplier 1=Mouser
JP1: library part "Header 2", "Jumper, 2-Pin (DNI)", LatestRevisionDate=17-Jul-2002, LatestRevisionNote="Re-released for DXP Platform.", Publisher="Altium Limited"
Q1 Q2 Q5 Q6: "Transistor MOSFET Negative Channel 100 Volt 0.17A 3-Pin SOT-23", Case/Package=SOT-23, Continuous Drain Current (ID)=170mA, Drain to Source Breakdown Voltage=100V, Drain to Source Resistance=6R, Gate to Source Voltage (Vgs)=20V, Input Capacitance=73pF, Manufacturer="ON Semiconductor / Fairchild", Manufacturer Part Number=BSS123, Max Operating Temperature=150°C, Max Power Dissipation=360mW, Min Operating Temperature=-55°C, Package Quantity=1, Supplier Part Number 1=512-BSS123, Threshold Voltage=1.7V, Category=MOSFETs, ComponentLink1Description="Manufacturer Link", ComponentLink1URL=http://www.irf.com/, ComponentLink2Description=https://datasheet.ciiva.com/3304/bss123-3304416.pdf?src-supplier=Avnet, ComponentLink2URL=https://datasheet.ciiva.com/3304/bss123-3304416.pdf?src-supplier=Avnet, ComponentLink3Description=https://datasheet.ciiva.com/4441/bss123-90724-4441226.pdf?src-supplier=Mouser, ComponentLink3URL=https://datasheet.ciiva.com/4441/bss123-90724-4441226.pdf?src-supplier=Mouser, ComponentLink4Description=https://datasheet.ciiva.com/17170/bss123-17170795.pdf?src-supplier=Future+Electronics, ComponentLink4URL=https://datasheet.ciiva.com/17170/bss123-17170795.pdf?src-supplier=Future+Electronics, Current Rating=170mA, DatasheetVersion=PD-9.814, Drain to Source Voltage (Vdss)=100V, Drain-source On Resistance-Max=6R, Dual Supply Voltage=100V, Fall Time=9ns, Height=0.93mm, LatestRevisionDate=17-Jul-2002, LatestRevisionNote="Re-released for DXP Platform.", Lead Free="Lead Free", Length=2.92mm, Mounting Technology="Surface Mount", Nominal Vgs=1.7V, Note="Pin 2 is electrically connected to pin 4.", Number of Channels=1NUMBER, Number of Elements=1, PackageDescription="TO, Thru-Hole, Vertical, Heatsink Mounted; 3 In-Line Leads; Pitch 2.54 mm", PackageReference=TO-220AB, PackageVersion=Feb-1997, Packaging="Tape and Reel", Pins=3, Polarity=N-CHANNEL, Power Dissipation=360mW, Pricing 1="1=0.35, 10=0.261, 50=0.261, 100=0.148, 1000=0.075, 10000=0.052 (USD)", Published=8-Jun-2000, Publisher="Altium Limited", Radiation Hardening=No, Rds On Max=6R, Reach SVHC Compliant=No, Rise Time=9ns, RoHS=Yes, RoHS Compliant=Yes, Series=-, Stock 1=1883, Supplier 1=Mouser, Turn-Off Delay Time=17ns, Turn-On Delay Time=1.7ns, Voltage=100V, Voltage Rating (DC)=100V, Width=1.3mm
Q3 Q4: library part PNP_SOT23, "Transistor: 200mA 200mW PNP General-Purpose Amplifier, SOT-23, 7IN. Reel", Case/Package=SOT-23, Clock Frequency=250MHz, Collector Base Voltage (VCBO)=40V, Collector Emitter Saturation Voltage=-250mV, Collector-emitter Voltage-Max=400mV, Current Rating=-2A, Emitter Base Voltage (VEBO)=5V, Manufacturer=MCC, Manufacturer Part Number=MMBT3906-TP, Max Collector Current=200mA, Max Operating Temperature=150°C, Max Power Dissipation=300mW, Min Operating Temperature=-55°C, Package Quantity=3000, Supplier Part Number 1=833-MMBT3906-TP, Voltage Rating (DC)=-40V, Category=BJTs, Collector Emitter Breakdown Voltage=40V, Collector Emitter Voltage (VCEO)=40V, ComponentLink1Description=https://datasheet.ciiva.com/6362/mmbt3906sot-23-6362513.pdf?src-supplier=Digikey, ComponentLink1URL=https://datasheet.ciiva.com/6362/mmbt3906sot-23-6362513.pdf?src-supplier=Digikey, ComponentLink2Description=https://datasheet.ciiva.com/15200/getdatasheetpartid-321202-15200524.pdf?src-supplier=Verical, ComponentLink2URL=https://datasheet.ciiva.com/15200/getdatasheetpartid-321202-15200524.pdf?src-supplier=Verical, ComponentLink3Description=https://datasheet.octopart.com/MMBT3906-TP-MCC-datasheet-38265.pdf?src-supplier=Digikey, ComponentLink3URL=https://datasheet.octopart.com/MMBT3906-TP-MCC-datasheet-38265.pdf?src-supplier=Digikey, ComponentLink4Description=https://datasheet.octopart.com/MMBT3906-TP-MCC-datasheet-133517506.pdf?src-supplier=Future+Electronics, ComponentLink4URL=https://datasheet.octopart.com/MMBT3906-TP-MCC-datasheet-133517506.pdf?src-supplier=Future+Electronics, ComponentLink5Description=https://datasheet.octopart.com/MMBT3906-TP-Micro-Commercial-datasheet-13551255.pdf?src-supplier=Future+Electronics, ComponentLink5URL=https://datasheet.octopart.com/MMBT3906-TP-Micro-Commercial-datasheet-13551255.pdf?src-supplier=Future+Electronics, ComponentLink6Description=https://datasheet.octopart.com/MMBT3906-TP-Micro-Commercial-datasheet-12536892.pdf?src-supplier=Future+Electronics, ComponentLink6URL=https://datasheet.octopart.com/MMBT3906-TP-Micro-Commercial-datasheet-12536892.pdf?src-supplier=Future+Electronics, ComponentLink7Description=https://datasheet.octopart.com/MMBT3906-TP-MCC-datasheet-9940751.pdf?src-supplier=RS+(Formerly+Allied+Electronics), ComponentLink7URL=https://datasheet.octopart.com/MMBT3906-TP-MCC-datasheet-9940751.pdf?src-supplier=RS+(Formerly+Allied+Electronics), Frequency=250MHz, Gain Bandwidth Product=250MHz, Height=1.12mm, hFE Min=60, Lead Free="Lead Free", Length=3.04mm, Max Breakdown Voltage=40V, Mounting Technology="Surface Mount", Number of Elements=1, Packaging="Tape and Reel", Pins=3, Polarity=PNP, Power Dissipation=300mW, Pricing 1="1=0.1, 10=0.06, 50=0.06, 100=0.026, 1000=0.018, 3000=0.013, 9000=0.011, 10000=0.011 (USD)", Radiation Hardening=No, RoHS Compliant=Yes, Series=-, Stock 1=36273, Supplier 1=Mouser, Transition Frequency=250MHz, Width=1.4mm
R1 R2: library part CMP-2002-07535-1, "Res Thick Film 0603 1M Ohm 1% 1/10W ±100ppm/°C Molded SMD Punched Carrier T/R", Case Code (Imperial)=0603, Case Code (Metric)=1608, Manufacturer=Panasonic, Manufacturer Part Number=ERJ-3EKF1004V, Max Operating Temperature=155°C, Max Power Dissipation=100mW, Min Operating Temperature=-55°C, Package Quantity=1, Resistance Tolerance=1%, Resistor Type="Thick Film", Supplier Part Number 1=667-ERJ-3EKF1004V, Temperature Coefficient=100ppm/°C, Voltage Rating=75V, Case/Package=0603, Category="Chip SMD Resistors", ComponentLink1Description=http://www.farnell.com/datasheets/1911175.pdf?src-supplier=Farnell, ComponentLink1URL=http://www.farnell.com/datasheets/1911175.pdf?src-supplier=Farnell, ComponentLink2Description=http://www.farnell.com/datasheets/1678782.pdf?src-supplier=Farnell, ComponentLink2URL=http://www.farnell.com/datasheets/1678782.pdf?src-supplier=Farnell, ComponentLink3Description=http://components.arrow.com/part/dataview/3985224S9849817N1386?src-supplier=Arrow+Electronics, ComponentLink3URL=http://components.arrow.com/part/dataview/3985224S9849817N1386?src-supplier=Arrow+Electronics, ComponentLink4Description=http://www.farnell.com/datasheets/1911175.pdf?src-supplier=Element14, ComponentLink4URL=http://www.farnell.com/datasheets/1911175.pdf?src-supplier=Element14, ComponentLink5Description=http://www.farnell.com/datasheets/1678782.pdf?src-supplier=Element14, ComponentLink5URL=http://www.farnell.com/datasheets/1678782.pdf?src-supplier=Element14, ComponentLink6Description=https://datasheet.octopart.com/ERJ-3EKF1004V-Panasonic-datasheet-10025800.pdf?src-supplier=Element14, ComponentLink6URL=https://datasheet.octopart.com/ERJ-3EKF1004V-Panasonic-datasheet-10025800.pdf?src-supplier=Element14, ComponentLink7Description=https://datasheet.octopart.com/ERJ-3EKF1004V-Panasonic-datasheet-136608610.pdf?src-supplier=Farnell, ComponentLink7URL=https://datasheet.octopart.com/ERJ-3EKF1004V-Panasonic-datasheet-136608610.pdf?src-supplier=Farnell, ComponentLink8Description=https://datasheet.octopart.com/ERJ-3EKF1004V-Panasonic-datasheet-82288794.pdf?src-supplier=Future+Electronics, ComponentLink8URL=https://datasheet.octopart.com/ERJ-3EKF1004V-Panasonic-datasheet-82288794.pdf?src-supplier=Future+Electronics, ComponentLink9Description=http://industrial.panasonic.com/www-data/pdf/AOA0000/AOA0000CE2.pdf?src-supplier=Avnet, ComponentLink9URL=http://industrial.panasonic.com/www-data/pdf/AOA0000/AOA0000CE2.pdf?src-supplier=Avnet, ComponentLink10Description=https://datasheet.octopart.com/ERJ-3EKF1004V-Panasonic-datasheet-154766169.pdf?src-supplier=Master+Electronics, ComponentLink10URL=https://datasheet.octopart.com/ERJ-3EKF1004V-Panasonic-datasheet-154766169.pdf?src-supplier=Master+Electronics, Construction=Rectangular, Contact Plating=Tin, Depth=0.8mm, Features="Automotive AEC-Q200", Height=0.022inch, Lead Free=5697LeadFree, Length=1.6mm, Military Standard=Not, Mounting Technology="Surface Mount", Number of Terminations=2, Packaging="Tape and Reel", Pins=2, Power Rating=100mW, Pricing 1="1=0.11, 10=0.043, 50=0.043, 100=0.017, 1000=0.008, 5000=0.005, 10000=0.004 (USD)", Reach SVHC Compliant=No, Resistance=1M0, RoHS=Yes, RoHS Compliant=Yes, Series=ERJ, Stock 1=940335, Supplier 1=Mouser, Termination=SMD/SMT, Tolerance=1%, Voltage Rating (DC)=75V, Width=0.8mm
R3 R8 R11 R12 R15 R19 R22 R27 R28: library part CMP-2002-07535-1, "SMD Chip Resistor, 10 kohm, ± 1%, 100 mW, 0603 [1608 Metric], Thick Film, Precision", Case Code (Imperial)=0603, Case Code (Metric)=1608, Manufacturer=Panasonic, Manufacturer Part Number=ERJ-3EKF1002V, Max Operating Temperature=155°C, Max Power Dissipation=100mW, Min Operating Temperature=-55°C, Package Quantity=1, Resistance Tolerance=1%, Resistor Type="Thick Film", Supplier Part Number 1=667-ERJ-3EKF1002V, Temperature Coefficient=100ppm/°C, Voltage Rating=75V, Case/Package=0603, Category="Chip SMD Resistors", ComponentLink1Description=https://datasheet.ciiva.com/16759/70260748-16759807.pdf?src-supplier=Allied+Electronics, ComponentLink1URL=https://datasheet.ciiva.com/16759/70260748-16759807.pdf?src-supplier=Allied+Electronics, Construction=Rectangular, Contact Plating=Tin, Depth=0.8mm, Features="Automotive AEC-Q200", Height=0.45mm, Lead Free=5697LeadFree, Length=1.6mm, Military Standard=Not, Mounting Technology="Surface Mount", Number of Terminations=2, Packaging="Tape and Reel", Pins=2, Power Rating=100mW, Pricing 1="1=0.1, 10=0.02, 50=0.02, 100=0.012, 1000=0.009, 5000=0.006, 10000=0.006, 100000=0.005 (USD)", Radiation Hardening=No, Reach SVHC Compliant=No, Resistance=10K, RoHS=Yes, RoHS Compliant=Yes, Series=ERJ, Stock 1=4766252, Supplier 1=Mouser, Technology="THICK FILM", Termination=SMD/SMT, Tolerance=1%, Voltage Rating (DC)=75V, Width=0.8mm
R4 R5 R20 R21 R29 R30 R31 R32: library part CMP-2002-07535-1, "CRCW Thick Film Commodity Chip Resistor 0603 Size 43 Ohm 1% 0.1 W 100 ppm/K 2-Pin SMD Paper T/R", Case/Package=345Case, Manufacturer=Vishay, Manufacturer Part Number=CRCW060343R0FKEAC, Supplier Part Number 1=71-CRCW060343R0FKEAC, Category="Chip SMD Resistors", Lead Free=5697LeadFree, Pricing 1="1=0.1, 10=0.018, 50=0.018, 100=0.008, 1000=0.006, 10000=0.003 (USD)", Resistance=43R0, RoHS=Yes, Stock 1=77921, Supplier 1=Mouser
R6: library part CMP-2002-07535-1, "CRCW Thick Film Commodity Chip Resistor 0603 Size 1K Ohm 1% 0.1 W 100 ppm/K 2-Pin SMD Paper T/R", Case/Package=345Case, Manufacturer="Vishay Dale", Manufacturer Part Number=CRCW06031K00FKECC, Supplier Part Number 1=71-CRCW06031K00FKECC, Category="Chip SMD Resistors", Lead Free=5697LeadFree, Pricing 1="1=0.1, 10=0.018, 50=0.018, 100=0.008, 1000=0.006, 10000=0.004 (USD)", Resistance=1K0, RoHS=Yes, RoHS Compliant=Yes, Stock 1=54714, Supplier 1=Mouser
R7: library part CMP-2002-07535-1, Resistance=DNI
R9 R13: library part CMP-2002-07535-1, "SMD Chip Resistor, 49.9 kOhm, ± 1%, 100 mW, 0603 [1608 Metric], Thick Film, General Purpose", Case/Package=0603, Manufacturer=Vishay, Manufacturer Part Number=CRCW060349K9FKEC, Max Operating Temperature=155°C, Max Power Dissipation=100mW, Min Operating Temperature=-55°C, Package Quantity=20000, Supplier Part Number 1=71-CRCW060349K9FKEC, Temperature Coefficient=100ppm/°C, Tolerance=1%, Voltage Rating=75V, Category="Chip SMD Resistors", ComponentLink1Description=http://components.arrow.com/part/dataview/41404748S9458418N6892?src-supplier=Arrow+Electronics, ComponentLink1URL=http://components.arrow.com/part/dataview/41404748S9458418N6892?src-supplier=Arrow+Electronics, ComponentLink2Description=http://www.vishay.com/docs/20035/dcrcwe3.pdf?src-supplier=Avnet, ComponentLink2URL=http://www.vishay.com/docs/20035/dcrcwe3.pdf?src-supplier=Avnet, ComponentLink3Description=http://www.vishay.com/docs/20035/dcrcwe3.pdf?src-supplier=Digikey, ComponentLink3URL=http://www.vishay.com/docs/20035/dcrcwe3.pdf?src-supplier=Digikey, ComponentLink4Description=https://www.verical.com/server-webapp/html/getDatasheet?partID=52041&src-supplier=Verical, ComponentLink4URL=https://www.verical.com/server-webapp/html/getDatasheet?partID=52041&src-supplier=Verical, Construction=Rectangular, Contact Plating=Tin, Depth=0.85mm, Features="Automotive AEC-Q200", Height=0.02inch, Lead Free="Lead Free", Length=1.55mm, Military Standard=Not, Mounting Technology="Surface Mount", Number of Terminations=2, Packaging="Tape and Reel", Power Rating=100mW, Pricing 1="1=0.1, 10=0.017, 50=0.017, 100=0.01, 1000=0.007, 10000=0.004 (USD)", Radiation Hardening=No, Resistance=49K9, RoHS=Yes, RoHS Compliant=Yes, Series=CRCW, Stock 1=47154, Supplier 1=Mouser, Width=0.033inch
R10 R14: library part CMP-2002-07535-1, "Res Thick Film 0603 5.11K Ohm 1% 0.1W(1/10W) ±100ppm/C Pad SMD Automotive T/R", Case Code (Imperial)=0603, Case Code (Metric)=1608, Manufacturer=Panasonic, Manufacturer Part Number=ERJ-3EKF5111V, Max Operating Temperature=155°C, Max Power Dissipation=100mW, Min Operating Temperature=-55°C, Package Quantity=1, Resistance Tolerance=1%, Resistor Type="Thick Film", Supplier Part Number 1=667-ERJ-3EKF5111V, Temperature Coefficient=100ppm/°C, Voltage Rating=75V, Voltage Rating (DC)=50V, Case/Package=0603, Category="Chip SMD Resistors", ComponentLink1Description=https://datasheet.ciiva.com/48531/aoa0000ce2-48531020.pdf?src-supplier=Avnet, ComponentLink1URL=https://datasheet.ciiva.com/48531/aoa0000ce2-48531020.pdf?src-supplier=Avnet, ComponentLink2Description=https://datasheet.ciiva.com/46389/426256-46389989.pdf?src-supplier=Element14, ComponentLink2URL=https://datasheet.ciiva.com/46389/426256-46389989.pdf?src-supplier=Element14, ComponentLink3Description=https://datasheet.ciiva.com/28695/1678782-28695818.pdf?src-supplier=Element14, ComponentLink3URL=https://datasheet.ciiva.com/28695/1678782-28695818.pdf?src-supplier=Element14, ComponentLink4Description=https://datasheet.ciiva.com/16770/70260748-16770758.pdf?src-supplier=Allied+Electronics, ComponentLink4URL=https://datasheet.ciiva.com/16770/70260748-16770758.pdf?src-supplier=Allied+Electronics, Construction=Rectangular, Contact Plating=Tin, Depth=0.8mm, Features="Automotive AEC-Q200", Height=0.45mm, Lead Free="Lead Free", Length=1.6mm, Military Standard=Not, Mounting Technology="Surface Mount", Number of Terminations=2, Packaging="Tape and Reel", Power Rating=100mW, Pricing 1="1=0.1, 10=0.02, 50=0.02, 100=0.012, 1000=0.008, 5000=0.005, 10000=0.005 (USD)", Radiation Hardening=No, Reach SVHC Compliant=No, Resistance=5K11, RoHS=Yes, RoHS Compliant=Yes, Series=ERJ, Stock 1=209189, Supplier 1=Mouser, Technology="THICK FILM", Termination=SMD/SMT, Tolerance=1%, Width=0.8mm
R16 R17 R25 R26: library part CMP-2002-07535-1, "Res Thick Film 1206 562 Ohm 1% 0.25W(1/4W) ±100ppm/C Pad SMD T/R", Case Code (Imperial)=1206, Case Code (Metric)=3216, Manufacturer=Yageo, Manufacturer Part Number=RC1206FR-07562RL, Max Operating Temperature=155°C, Max Power Dissipation=250mW, Min Operating Temperature=-55°C, Package Quantity=5000, Supplier Part Number 1=603-RC1206FR-07562RL, Temperature Coefficient=100ppm/°C, Tolerance=1%, Voltage Rating=200V, Case/Package=1206, Category="Chip SMD Resistors", ComponentLink1Description=https://datasheet.ciiva.com/16742/pyu-rc1206-51-rohs-l-4-16742492.pdf?src-supplier=Future+Electronics, ComponentLink1URL=https://datasheet.ciiva.com/16742/pyu-rc1206-51-rohs-l-4-16742492.pdf?src-supplier=Future+Electronics, ComponentLink2Description=https://datasheet.ciiva.com/15159/getdatasheetpartid-32963-15159365.pdf?src-supplier=Verical, ComponentLink2URL=https://datasheet.ciiva.com/15159/getdatasheetpartid-32963-15159365.pdf?src-supplier=Verical, Construction=Rectangular, Depth=1.6mm, Features="Moisture Resistant", Height=0.55mm, Lead Free="Lead Free", Length=3.1mm, Military Standard=Not, Number of Terminations=2, Packaging="Tape and Reel", Power Rating=250mW, Pricing 1="1=0.1, 10=0.024, 50=0.024, 100=0.014, 1000=0.01, 10000=0.006 (USD)", Resistance=562R, RoHS=Yes, RoHS Compliant=Yes, Series=RC, Stock 1=16436, Supplier 1=Mouser, Technology="THICK FILM", Termination=SMD/SMT, Voltage Rating (DC)=200V, Width=1.6mm, Working Voltage=200V
R18 R24: library part CMP-2002-07535-1, "CRCW Thick Film Commodity Chip Resistor 0603 Size 3.3K Ohm 1% 0.1 W 100 ppm/K 2-Pin SMD Paper T/R", Manufacturer=Vishay, Manufacturer Part Number=CRCW06033K30FKEBC, Supplier Part Number 1=71-CRCW06033K30FKEBC, Category="Chip SMD Resistors", Pricing 1="1=0.1, 10=0.031, 50=0.031, 100=0.013, 1000=0.006, 10000=0.004 (USD)", Resistance=3K3, RoHS=Yes, RoHS Compliant=Yes, Stock 1=56488, Supplier 1=Mouser
R23: library part CMP-2002-07535-1, "Res Thick Film 1206 909 Ohm 1% 0.25W(1/4W) ±100ppm/C Pad SMD T/R", Case Code (Imperial)=1206, Case Code (Metric)=3216, Manufacturer=Yageo, Manufacturer Part Number=RC1206FR-07909RL, Max Operating Temperature=155°C, Max Power Dissipation=250mW, Min Operating Temperature=-55°C, Supplier Part Number 1=603-RC1206FR-07909RL, Temperature Coefficient=100ppm/°C, Tolerance=1%, Voltage Rating=200V, Case/Package=1206, Category="Chip SMD Resistors", ComponentLink1Description=https://datasheet.ciiva.com/16745/pyu-rc1206-51-rohs-l-4-16745945.pdf?src-supplier=Future+Electronics, ComponentLink1URL=https://datasheet.ciiva.com/16745/pyu-rc1206-51-rohs-l-4-16745945.pdf?src-supplier=Future+Electronics, Features="Moisture Resistant", Height=0.55mm, Lead Free="Lead Free", Length=3.2mm, Number of Terminations=2, Packaging="Tape and Reel", Power Rating=250mW, Pricing 1="1=0.1, 10=0.025, 50=0.025, 100=0.015, 1000=0.013, 10000=0.006 (USD)", Resistance=909R, RoHS=Yes, RoHS Compliant=Yes, Series=RC, Stock 1=11665, Supplier 1=Mouser, Termination=SMD/SMT, Voltage Rating (DC)=200V, Weight=0.000571oz, Width=1.6mm
SW1 SW2: library part "SW Pushbutton", "PTS125 Series 50 mA 12 V SPST-NO Off-Mom Through Hole Tactile Switch", Manufacturer="ITT C&K", Manufacturer Part Number=PTS125SL43P25MLFS, Supplier Part Number 1=611-PTS125SL43P25LFS, Category=Uncategorized, Pricing 1="1=0.43, 10=0.392, 50=0.392, 100=0.309, 1000=0.257, 10000=0.222 (USD)", RoHS=No, RoHS Compliant=No, Stock 1=14281, Supplier 1=Mouser
TP1 TP2 TP3 TP4 TP5 TP6 TP7 TP8 TP9: "Part of PCB"
U1: "RISC Microcontroller, 32-Bit, FLASH, CORTEX-M4F CPU, 180MHz, CMOS, PBGA216", Manufacturer=STMicroelectronics, Supplier Part Number 1=511-STM32C031C6T6, Category=Uncategorized, Manufacturer Part Number=STM32C031C6T6, Mfr_Name=STMicroelectronics, Pricing 1="1=1.93, 10=1.4, 50=1.4, 100=1.39, 1000=0.946, 10000=0.848 (USD)", RefDes=RefDes, RoHS=No, Stock 1=1018, Supplier 1=Mouser, Type=Type
U2: library part LM4040-SOT23, "Fixed voltage, 45-µA, precision micropower shunt voltage reference 3-SOT-23 -40 to 85", Case/Package=SOT-23, Cathode Current=75uA, Manufacturer="Texas Instruments", Manufacturer Part Number=LM4040C25IDBZR, Max Operating Temperature=125°C, Max Output current=15mA, Max Output Voltage=2.5V, Min Operating Temperature=-40°C, Package Quantity=1, Supplier Part Number 1=595-LM4040C25IDBZR, Temperature Coefficient=100ppm/°C, Tolerance=0.5%, Category="Voltage References", ComponentLink1Description=https://datasheet.ciiva.com/2006/lm4040d82-2006368.pdf?src-supplier=Digikey, ComponentLink1URL=https://datasheet.ciiva.com/2006/lm4040d82-2006368.pdf?src-supplier=Digikey, ComponentLink2Description=https://datasheet.ciiva.com/41677/1848915-41677303.pdf?src-supplier=Newark, ComponentLink2URL=https://datasheet.ciiva.com/41677/1848915-41677303.pdf?src-supplier=Newark, ComponentLink3Description=https://datasheet.ciiva.com/46391/1887470-46391479.pdf?src-supplier=Element14, ComponentLink3URL=https://datasheet.ciiva.com/46391/1887470-46391479.pdf?src-supplier=Element14, ComponentLink4Description=https://datasheet.ciiva.com/46424/1848915-46424687.pdf?src-supplier=Element14, ComponentLink4URL=https://datasheet.ciiva.com/46424/1848915-46424687.pdf?src-supplier=Element14, ComponentLink5Description=https://datasheet.ciiva.com/2006/lm4040d82-2006367.pdf?src-supplier=Digikey, ComponentLink5URL=https://datasheet.ciiva.com/2006/lm4040d82-2006367.pdf?src-supplier=Digikey, ComponentLink6Description=https://datasheet.ciiva.com/2006/lm4040d82-2006366.pdf?src-supplier=Digikey, ComponentLink6URL=https://datasheet.ciiva.com/2006/lm4040d82-2006366.pdf?src-supplier=Digikey, ComponentLink7Description=https://datasheet.ciiva.com/15148/getdatasheetpartid-111141-15148621.pdf?src-supplier=Verical, ComponentLink7URL=https://datasheet.ciiva.com/15148/getdatasheetpartid-111141-15148621.pdf?src-supplier=Verical, ComponentLink8Description=https://datasheet.ciiva.com/3235/lm4040d82-3235387.pdf?src-supplier=Avnet, ComponentLink8URL=https://datasheet.ciiva.com/3235/lm4040d82-3235387.pdf?src-supplier=Avnet, Lead Free="Lead Free", Number of Channels=1, Output Current=15mA, Output Voltage=2.5V, Packaging="Tape and Reel", Pins=3, Pricing 1="1=0.83, 10=0.73, 50=0.73, 100=0.587, 1000=0.443, 10000=0.363 (USD)", Radiation Hardening=No, Reach SVHC Compliant=No, Reference Type=Shunt, Reference Voltage=2.5V, RoHS=Yes, RoHS Compliant=Yes, Series=-, Stock 1=26053, Supplier 1=Mouser
U3 U4: "Dual H Bridge Driver IC 2.5V to 16V 16-Pin TSSOP", Manufacturer=Toshiba, Manufacturer Part Number=TC78H660FNG,EL, Supplier Part Number 1=757-TC78H660FNGEL, Pricing 1="1=0.88, 10=0.779, 50=0.779, 100=0.653, 500=0.604, 1000=0.537, 2000=0.53, 4000=0.503, 8000=0.484, 10000=0.484, 24000=0.483 (USD)", RoHS=No, Stock 1=15852, Supplier 1=Mouser
U5: "1.35A 3.3V LDO Reg. Current Limit TO-252", Case/Package=TO-252-3, Dropout Voltage=1.3V, Manufacturer=Diodes, Manufacturer Part Number=AZ1117CD-3.3TRG1, Max Operating Temperature=125°C, Max Output current=1.35A, Max Supply Voltage=15V, Min Current Limit=1A, Min Operating Temperature=-20°C, Output Current=800mA, Output Voltage=3.3V, Package Quantity=1, Quiescent Current=4mA, Reference Voltage=1.262V, Supplier Part Number 1=621-AZ1117CD-3.3TRG1, Accuracy=1%, Category="Voltage Regulators - Linear", ComponentLink1Description=https://datasheet.ciiva.com/29568/az1117c-29568368.pdf?src-supplier=Digikey, ComponentLink1URL=https://datasheet.ciiva.com/29568/az1117c-29568368.pdf?src-supplier=Digikey, ComponentLink2Description=https://datasheet.ciiva.com/29568/az1117c-29568366.pdf?src-supplier=Digikey, ComponentLink2URL=https://datasheet.ciiva.com/29568/az1117c-29568366.pdf?src-supplier=Digikey, ComponentLink3Description=https://datasheet.ciiva.com/29568/az1117c-29568367.pdf?src-supplier=Digikey, ComponentLink3URL=https://datasheet.ciiva.com/29568/az1117c-29568367.pdf?src-supplier=Digikey, ComponentLink4Description=https://datasheet.ciiva.com/30016/az1117c-30016668.pdf?src-supplier=Avnet, ComponentLink4URL=https://datasheet.ciiva.com/30016/az1117c-30016668.pdf?src-supplier=Avnet, Height=2.39mm, Lead Free="Lead Free", Length=6.7mm, Mounting Technology="Surface Mount", Number of Channels=1NUMBER, Number of Outputs=1, Number of Regulators=1, Output Type=Fixed, Packaging="Tape and Reel", Pins=3, Polarity=Positive, Pricing 1="1=0.44, 10=0.321, 50=0.321, 100=0.18, 1000=0.133, 10000=0.115 (USD)", RoHS=Yes, RoHS Compliant=Yes, Series=AZ1117CD, Stock 1=13050, Supplier 1=Mouser, Width=6.2mm